# Altium PCB PCB4210B_A00.PcbDoc (part 1 of 2)
Units mm, origin at the board's own origin, x right, y up, seen from the top; angles counter-clockwise.
Board outline 92 x 45 mm, 4 copper layers (Top Layer, Signal Layer 2, Signal Layer 3, Bottom Layer), stack 1.6 mm thick; 99 components, 93 nets, 352 pads, 891 vias.
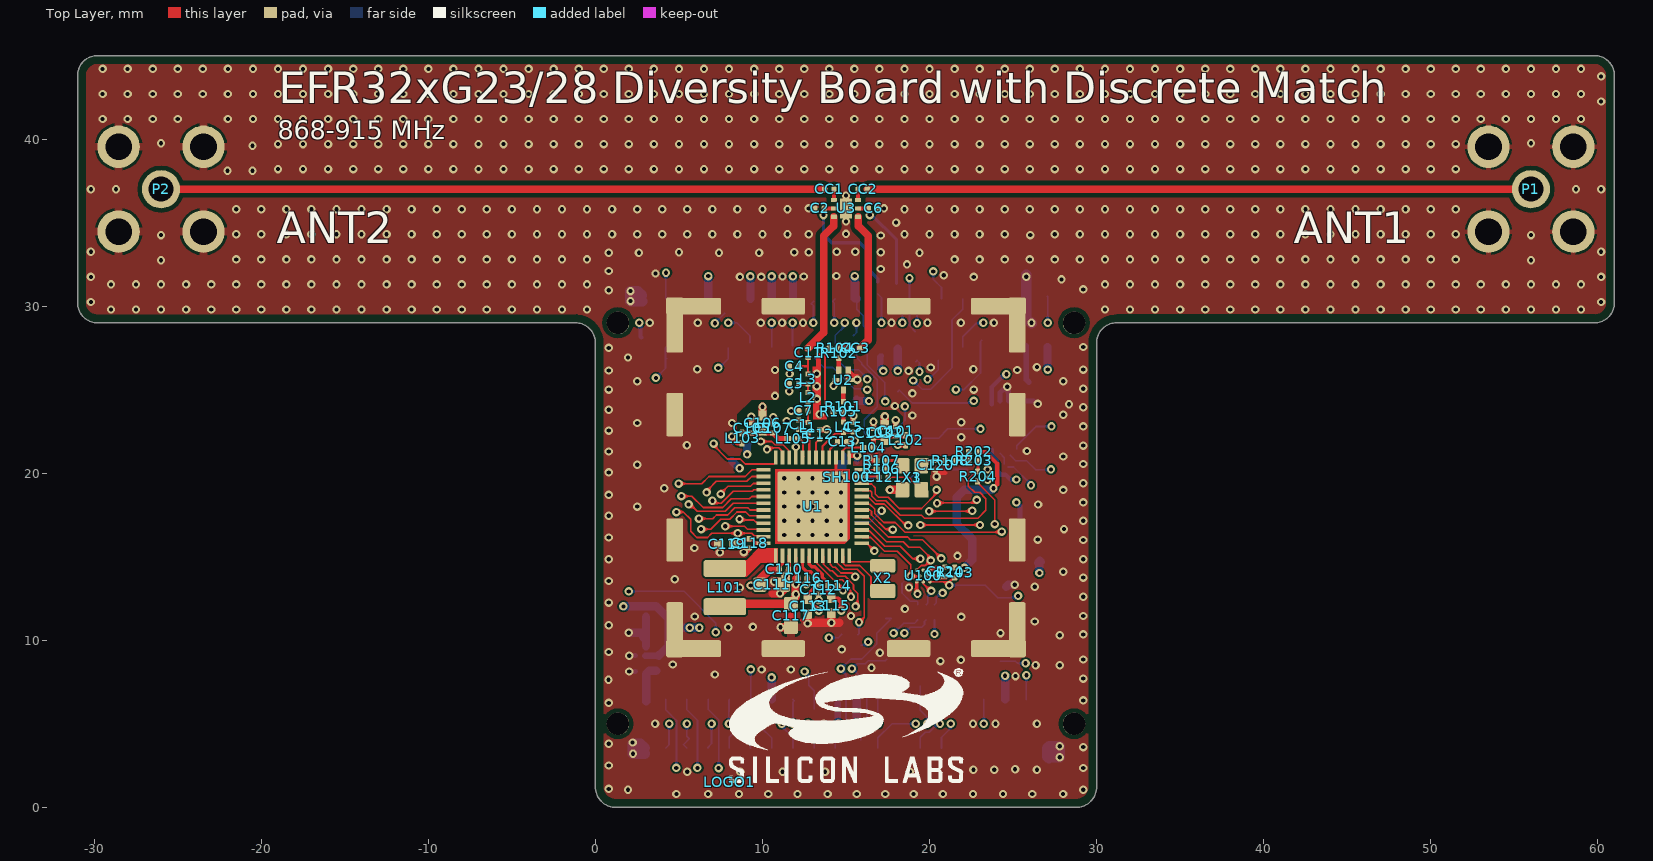
[diagram p0: Top Layer view]
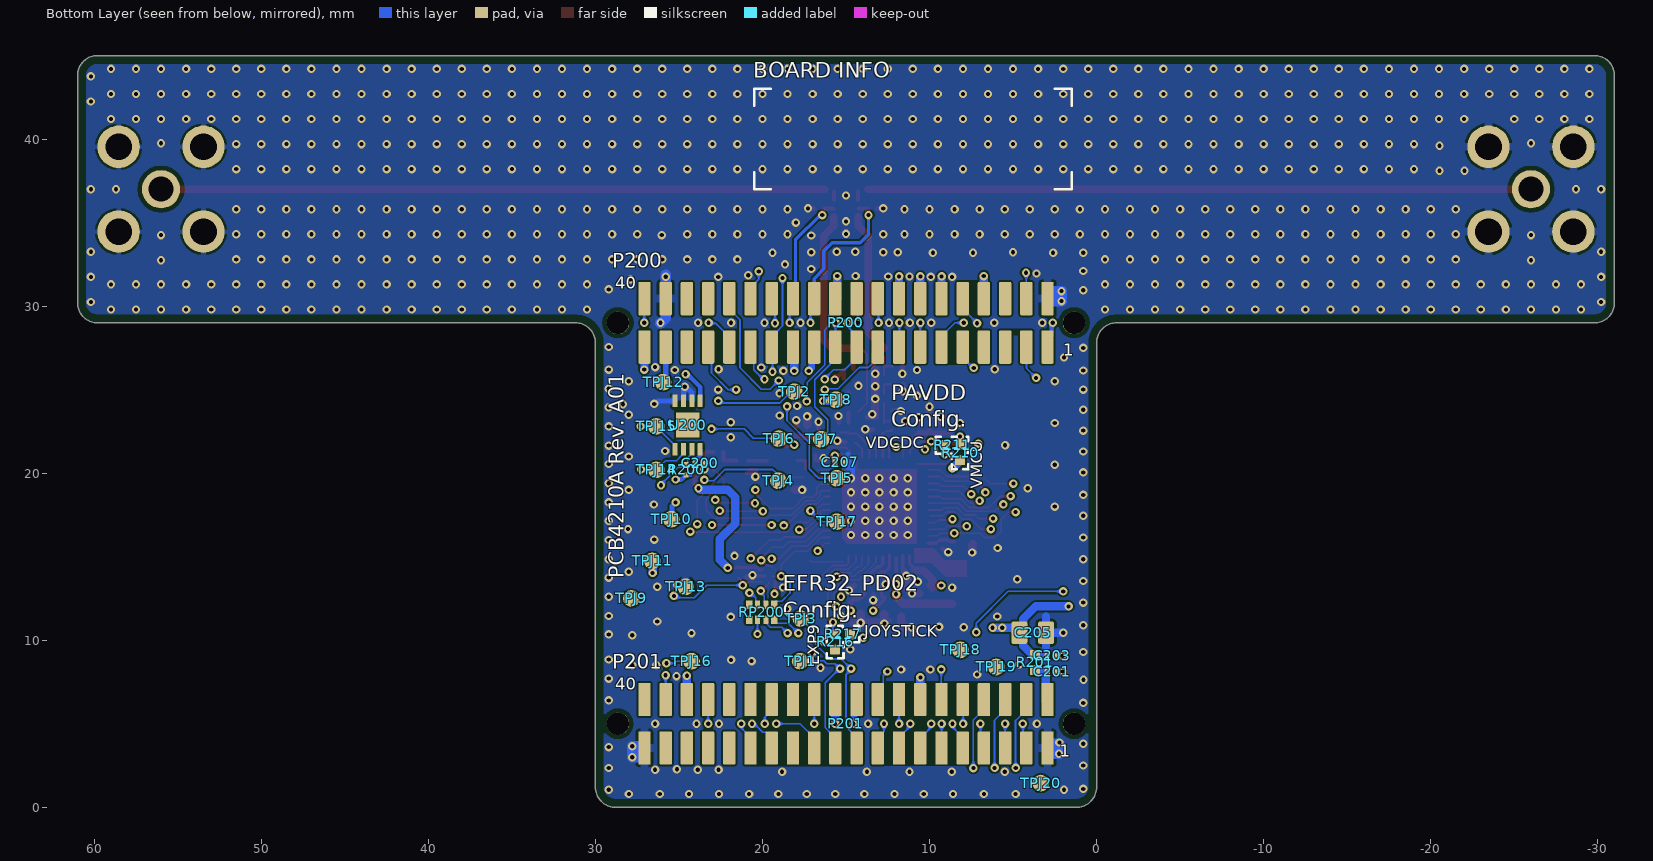
[diagram p1: Bottom Layer view, seen from below]
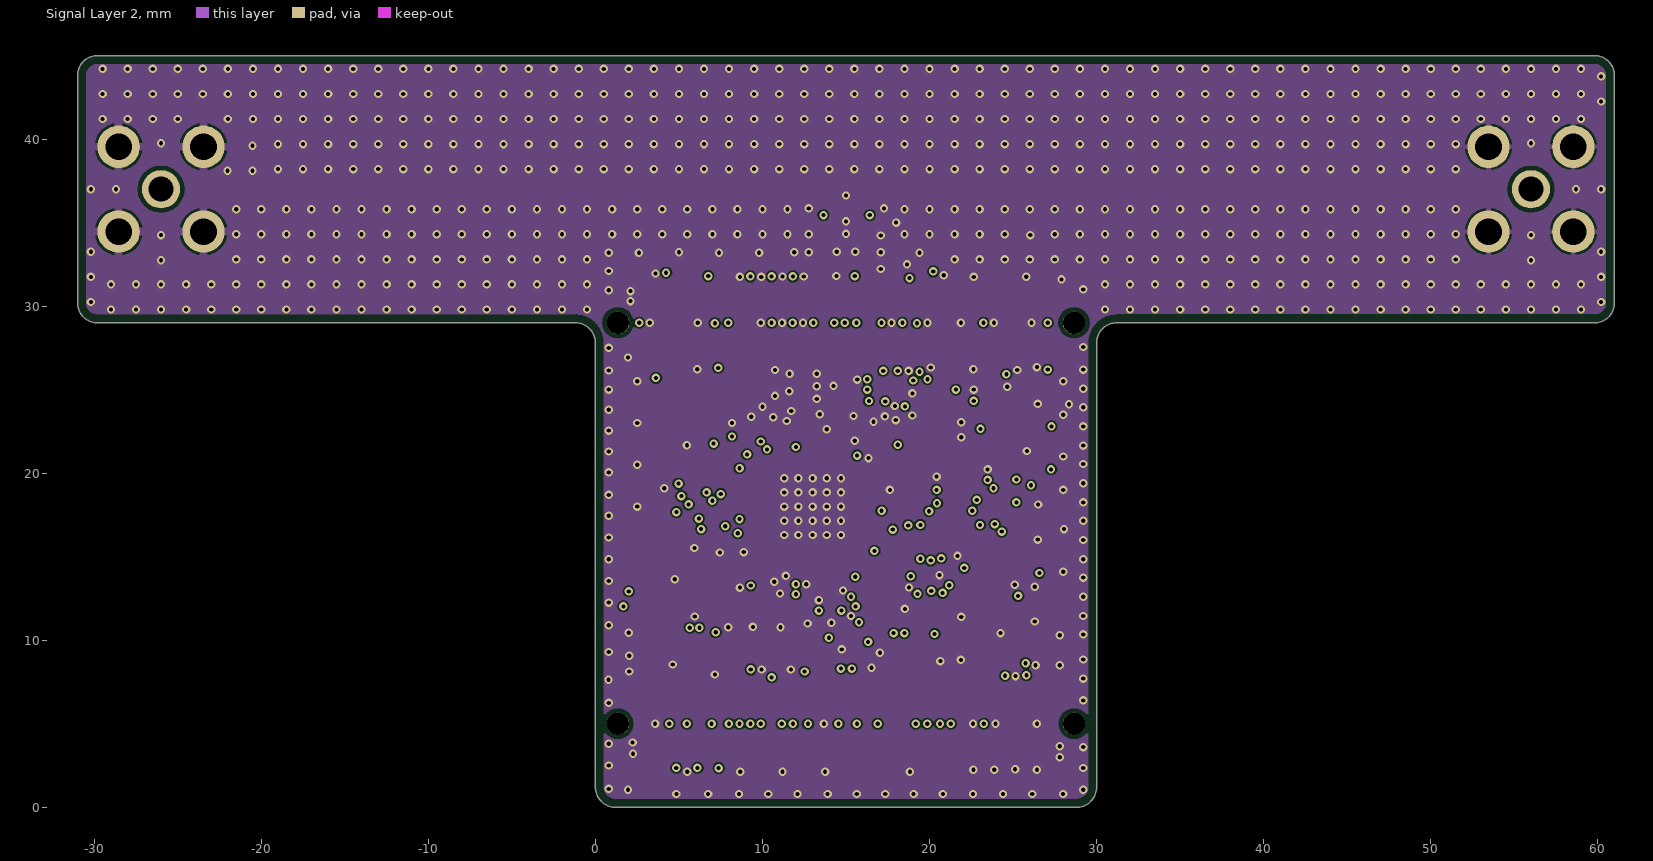
[diagram p2: Signal Layer 2]
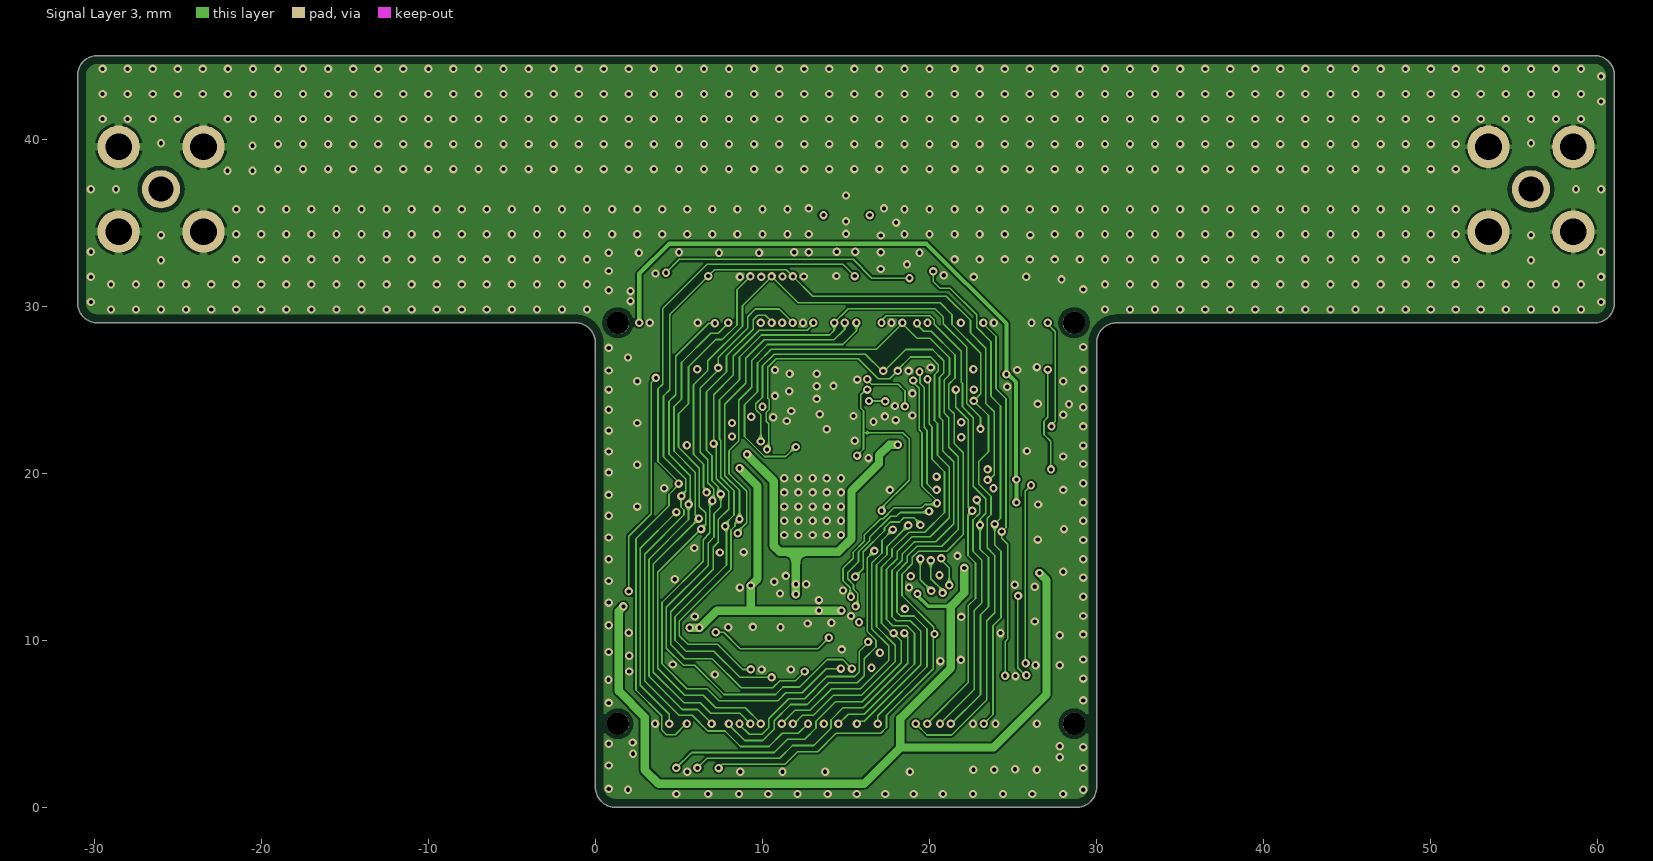
[diagram p3: Signal Layer 3]

## Layer stack, top to bottom
Top Solder: solder mask 0.0102, Solder Resist, Dk 3.5
Top Layer: signal copper 0.035
Dielectric 1: core 0.325, FR-4, Dk 4.2
Signal Layer 2: signal copper 0.018
Dielectric 3: prepreg 0.844, Dk 4.2
Signal Layer 3: signal copper 0.018
Dielectric 2: core 0.325, Dk 4.2
Bottom Layer: signal copper 0.035
Bottom Solder: solder mask 0.0102, Solder Resist, Dk 3.5

## Board outline
0,27.8 ccw(c-1.2,27.8) -1.2,29 -29.8,29 cw(c-29.8,30.2) -31,30.2 -31,43.8 cw(c-29.8,43.8) -29.8,45 59.8,45 cw(c59.8,43.8) 61,43.8 61,30.2 cw(c59.8,30.2) 59.8,29 31.2,29 ccw(c31.2,27.8) 30,27.8 30,1.2 cw(c28.8,1.2) 28.8,0 1.2,0 cw(c1.2,1.2) 0,1.2

## Design rules (kind name [scope] priority, off if disabled: settings)
AcuteAngle [All] p1: minimum=7.00000000000000E+0001 checktracksonly=FALSE
BoardOutlineClearance [All] p1: gap=0.5 ignorepadtopadclearanceinfootprint=FALSE
Clearance Clearance_50Ohm [InNetClass('50Ohm') vs InNet('GND')] p1: gap=0.254 ignorepadtopadclearanceinfootprint=FALSE except(0.15: Track-SMDPad; 0.2: SMDPad-SMDPad)
Clearance Clearance_to_Holes [InPadClass('NPTH')] p2: gap=0.254 ignorepadtopadclearanceinfootprint=FALSE
Clearance Clerance_Polygon [InPolygon] p3: gap=0.1 ignorepadtopadclearanceinfootprint=FALSE
Clearance Clearance_General [All] p4: gap=0.1 ignorepadtopadclearanceinfootprint=FALSE
HoleToHoleClearance HoleToHoleClearance_ANT1toPAD [Incomponent ('ANT1') vs ISpad] p1: gap=0 allowstackedmicrovias=TRUE
HoleToHoleClearance HoleToHoleClearance_R1toR2_1 [Incomponent ('R1') vs Incomponent ('R2')] p2: gap=0 allowstackedmicrovias=TRUE
HoleToHoleClearance HoleToHoleClearance_U1toVIA_1 [InComponent ('U1') vs IsVia] p3: gap=0 allowstackedmicrovias=TRUE
HoleToHoleClearance [All] p4: gap=0.254 allowstackedmicrovias=TRUE
MinimumAnnularRing [All] p1: minimumring=0.125
MinimumSolderMaskSliver [All] p1: minsoldermaskwidth=0.075
PolygonConnect Polygon_VIA_Connect [IsVia] p1: connectstyle=Direct reliefconductorwidth=0.254 reliefentries=4 polygonreliefangle="90 Angle" airgapwidth=0.254
PolygonConnect PolygonConnect_SH100 [InComponent('SH100')] p2: connectstyle=Direct reliefconductorwidth=0.254 reliefentries=4 polygonreliefangle="90 Angle" airgapwidth=0.127
PolygonConnect PolygonConnect_P1 [InComponent('P1')] p3: connectstyle=Relief reliefconductorwidth=0.3 reliefentries=4 polygonreliefangle="90 Angle" airgapwidth=0.127
PolygonConnect [All] p4: connectstyle=Relief reliefconductorwidth=0.5 reliefentries=4 polygonreliefangle="90 Angle" airgapwidth=0.15
RoutingVias [All] p1: holewidth=0.3 width=0.65 viastyle="Through Hole" minholewidth=0.25 minwidth=0.5 maxholewidth=1 maxwidth=1.5
ShortCircuit ShortCircuit_ANTtoPAD [InNet('NetAT1_1') vs InNet('GND')] p1: allowed=TRUE
ShortCircuit ShortCircuit_R1toR2_1 [Incomponent ('R1') vs Incomponent ('R2')] p2: allowed=TRUE
ShortCircuit [All] p3: allowed=FALSE
SilkToSilkClearance [All] p1: silktosilkclearance=0.102
SilkToSolderMaskClearance [IsPad] p1: minsilkscreentomaskgap=0.102 clearancetoexposedcopper=TRUE
SolderMaskExpansion [All] p1: expansion=0.051 istentingtop=FALSE
SupplyNets "Schematic Supply Nets_9" [InNet('VMCU')] p1: voltage=0.000
SupplyNets "Schematic Supply Nets_8" [InNet('USB_VBUS')] p2: voltage=0.000
SupplyNets "Schematic Supply Nets_7" [InNet('VMCU_IN')] p3: voltage=0.000
SupplyNets "Schematic Supply Nets_6" [InNet('PAVDD')] p4: voltage=0.000
SupplyNets "Schematic Supply Nets_5" [InNet('VDCDC')] p5: voltage=0.000
SupplyNets "Schematic Supply Nets_4" [InNet('3V3')] p6: voltage=0.000
SupplyNets "Schematic Supply Nets_3" [InNet('GND')] p7: voltage=0.000
SupplyNets "Schematic Supply Nets_2" [InNet('VRF')] p8: voltage=0.000
SupplyNets "Schematic Supply Nets_1" [InNet('USB_VREG')] p9: voltage=0.000
SupplyNets "Schematic Supply Nets" [InNet('5V')] p10: voltage=0.000
Width 50ohm [InNet('50R*')] p1: maxlimit=0.457 minlimit=0.124 preferedwidth=0.457
Width [All] p2: maxlimit=5.08 minlimit=0.1 preferedwidth=0.125
25 further rules are at their usual default settings.

## Classes and differential pairs
net class 50Ohm: 50R_ANT_A 50R_ANT_B NetC11_2 NetCC1_1 NetCC2_1 NetCC3_1 NetCC3_2
net class WSTK_P[45..0]: DBG_SWCLK DBG_SWDIOTMS "DBG_SWO / DBG_TDO" DBG_TDI DEBUG_TRACED1 DEBUG_TRACED2 DEBUG_TRACED3 DISP_ENABLE DISP_EXTCOMIN DISP_SCLK DISP_SCS DISP_SI EFR32_PA0 EFR32_PA8 EFR32_PA9 EFR32_PA10 EFR32_PB0 EFR32_PB1 EFR32_PB2 EFR32_PB3 EFR32_PC0 EFR32_PC4 EFR32_PC5 EFR32_PC7 EFR32_PD3 EFR32_PD4 EFR32_PD5 EXP_HEADER6 EXP_HEADER9 JOYSTICK WSTK_P22 WSTK_P23 WSTK_P27 WSTK_P28 WSTK_P29 WSTK_P30 WSTK_P32 WSTK_P34 WSTK_P38 WSTK_P39 WSTK_P40
net class WSTK_F[21..0]: DBG_RESET DBG_SWCLK DBG_SWDIOTMS "DBG_SWO / DBG_TDO" DBG_TDI DISP_ENABLE DISP_EXTCOMIN DISP_SCLK DISP_SCS DISP_SI EFR32_PA0 EFR32_PA8 EFR32_PA9 EFR32_PA10 EFR32_PB0 EFR32_PB1 EFR32_PB2 EFR32_PB3 EFR32_PD3 EFR32_PD4 EFR32_PD5 WSTK_F21
net class EFR32_PD[5..0]: EFR32_PD0 EFR32_PD1 EFR32_PD2 EFR32_PD3 EFR32_PD4 EFR32_PD5
net class EFR32_PC[9..0]: DISP_ENABLE DISP_EXTCOMIN EFR32_PC0 EFR32_PC1 EFR32_PC2 EFR32_PC3 EFR32_PC4 EFR32_PC5 EFR32_PC7 EFR32_PC8
net class EFR32_PB[3..0]: EFR32_PB0 EFR32_PB1 EFR32_PB2 EFR32_PB3
net class EFR32_PA[10..0]: DBG_SWCLK DBG_SWDIOTMS "DBG_SWO / DBG_TDO" DBG_TDI DEBUG_TRACED1 DEBUG_TRACED2 DEBUG_TRACED3 EFR32_PA0 EFR32_PA8 EFR32_PA9 EFR32_PA10
component class "04_ WSTK Connectors & Board ID": C200 C201 C203 C205 P200 P201 R200 R201 TPJ1 TPJ2 TPJ3 TPJ4 TPJ5 TPJ6 TPJ7 TPJ8 TPJ9 TPJ10 TPJ11 TPJ12 TPJ13 TPJ14 TPJ15 TPJ16 TPJ17 TPJ18 TPJ19 TPJ20 U200
component class "03_ EFR32 Signal Assignments": C124 C207 R103 R202 R203 R204 R216 R217 RP200 U1 U100 X2
component class "02_ RF & Power": C1 C2 C3 C4 C5 C6 C7 C11 C12 C13 C101 C102 C103 C105 C106 C107 C110 C111 C112 C113 C114 C115 C116 C117 C118 C119 C120 C121 CC1 CC2 CC3 L1 L2 L3 L4 L101 L102 L103 L104 L105 P1 P2 R101 R102 R104 R105 R106 R107 R108 R210 R211 SH100 U2 U3 X1 X3
pad class NPTH: P200-M1 P200-M2 P201-M1 P201-M2

## Components (designator, comment, footprint, x,y, rotation, side; value= is the part's Value field where it differs from the comment)
C1 "1P9" C0201_L 12.175,22.9 r90 top
C2 "10P" C0201_L 13.425,35.85 r0 top
C3 "7P2" C0201_L 11.875,25.35 r180 top
C4 "1P3" C0201_L 11.9,26.4 r180 top
C5 "TBD" C0201_L 15.425,22.75 r90 top
C6 "10P" C0201_L 16.625,35.85 r180 top
C7 "NM" C0201_L 12.45,23.725 r180 top
C11 "220P" C0201_L 12.73,27.2 r90 top
C12 "1P5" C0201_L 13.425,22.325 r90 top
C13 "1P5" C0201_L 14.775,21.875 r0 top
C101 "TBD" C0201_L 17.975,22.5 r90 top
C102 "1U" C0402_L 17.325,22.425 r90 top
C103 "100P" C0201_L 16.65,22.4 r90 top
C105 "TBD" C0201_L 9.35,22.675 r90 top
C106 "470N" C0402_L 10,23 r90 top
C107 "100P" C0201_L 10.625,22.675 r90 top
C110 "100N" C0201_L 11.275,14.25 r0 top
C111 "10U" C0603_L 10.55,13.325 r0 top
C112 "10N" C0201_L 13.35,13.025 r270 top
C113 "1U" C0402_L 12.7,12.025 r270 top
C114 "100N" C0201_L 14.2,13.275 r0 top
C115 "1U" C0402_L 14.125,12.075 r270 top
C116 "100N" C0201_L 12.4,13.725 r0 top
C117 "4U7" C0603_L 11.7,11.475 r270 top
C118 "100N" C0201_L 9.2,15.8 r270 top
C119 "1U" C0402_L 7.85,15.75 r180 top
C120 "100N" C0201_L 20.35,20.475 r270 top
C121 "100P" C0201_L 17.25,19.75 r180 top
C124 "100N" C0201_L 20.925,14.1 r270 top
C200 "100N" C0201_L 23.75,20.6 r180 bottom
C201 "100N" C0201_L 2.675,8.125 r180 bottom
C203 "100N" C0201_L 2.675,9.075 r180 bottom
C205 "10U" C0805_L 3.825,10.45 r180 bottom
C207 "100N" C0201_L 15.375,20.65 r180 bottom
CC1 "47P" C0201_L 14,37 r180 top
CC2 "47P" C0201_L 16,37 r0 top
CC3 "47P" C0201_L 15.55,27.475 r0 top
Designator39 "Comment" PCB_SPEC_4_LAYER -68.7,108.2 r0 top
L1 "1N5" COIL_0201_L 12.725,22.725 r90 top
L2 "1N3" COIL_0201_L 12.725,24.525 r90 top
L3 "13N" COIL_0201_L 12.725,25.625 r90 top
L4 "18N" COIL_0201_L 14.85,22.75 r90 top
L101 "2U2" COIL_1008_L 7.75,13.15 r270 top
L102 "BLM03AG700SN1D" COIL_MUR_BLM03_0201 18.575,21.975 r90 top
L103 "0R" COIL_MUR_BLM03_0201 8.775,22.1 r90 top
L104 "0R" COIL_MUR_BLM03_0201 16.325,21.525 r180 top
L105 "BLM03PG330SN1D" COIL_MUR_BLM03_0201 11.825,22.075 r0 top
LOGO1 "Comment" LOGO_SILABS_W14.0 8,1.5 r0 top
P1 "SMA" TE_SMA_1814832_TH_VER 56,37 r0 top
P2 "SMA" TE_SMA_1814832_TH_VER -26,37 r0 top
P200 "SOCKET_WCON_2X20_1.27MM_SMD" SAM_SFC-120-T2-D-A-2X20_SNUM 15,29 r0 bottom locked
P201 "SOCKET_WCON_2X20_1.27MM_SMD" SAM_SFC-120-T2-D-A-2X20_SNUM 15,5 r0 bottom locked
R101 "0R" R0201_L 14.85,23.975 r90 top
R102 "0R" R0201_L 14.575,27.175 r90 top
R103 "330K" R0201_L 21.5,14.05 r90 top
R104 "NM" R0201_L 14.315,27.475 r180 top
R105 "NM" R0201_L 14.55,23.675 r180 top
R106 "NM" R0201_L 17.125,20.25 r180 top
R107 "0R" R0201_L 17.125,20.75 r180 top
R108 "0R" R0201_L 21.25,20.75 r180 top
R200 "10K" R0201_L 24.575,20.2 r270 bottom
R201 "0R" R0402_L 3.7,8.675 r90 bottom
R202 "0R" R0201_L 22.65,21.275 r0 top
R203 "NM" R0201_L 22.65,20.75 r0 top
R204 "0R" R0201_L 22.875,19.8 r90 top
R210 "0R" R0402_L 8.175,21.225 r270 bottom
R211 "0R" R0402_L 8.625,21.675 r180 bottom value=NM
R216 "0R" R0402_L 15.65,9.9 r270 bottom
R217 "0R" R0402_L 15.2,10.35 r180 bottom
RP200 "100R" RES_MNR04-8 20.05,11.675 r0 bottom
SH100 "RF_SHIELD_FRAME_36103205S" shield_21x21mm 15,19.75 r180 top locked
TPJ1 "TPJ_SMD" TP_1.0_SMD 17.75,8.75 r90 bottom locked
TPJ2 "TPJ_SMD" TP_1.0_SMD 18.1,24.88 r90 bottom locked
TPJ3 "TPJ_SMD" TP_1.0_SMD 17.7,11.3 r90 bottom locked
TPJ4 "TPJ_SMD" TP_1.0_SMD 19.05,19.55 r90 bottom locked
TPJ5 "TPJ_SMD" TP_1.0_SMD 15.55,19.7 r90 bottom locked
TPJ6 "TPJ_SMD" TP_1.0_SMD 19.02,22.07 r90 bottom locked
TPJ7 "TPJ_SMD" TP_1.0_SMD 16.49,22.03 r90 bottom locked
TPJ8 "TPJ_SMD" TP_1.0_SMD 15.6,24.4 r90 bottom locked
TPJ9 "TPJ_SMD" TP_1.0_SMD 27.85,12.5 r90 bottom locked
TPJ10 "TPJ_SMD" TP_1.0_SMD 25.45,17.25 r90 bottom locked
TPJ11 "TPJ_SMD" TP_1.0_SMD 26.6,14.75 r90 bottom locked
TPJ12 "TPJ_SMD" TP_1.0_SMD 25.95,25.45 r90 bottom locked
TPJ13 "TPJ_SMD" TP_1.0_SMD 24.6,13.2 r90 bottom locked
TPJ14 "TPJ_SMD" TP_1.0_SMD 26.35,20.2 r90 bottom locked
TPJ15 "TPJ_SMD" TP_1.0_SMD 26.35,22.8 r90 bottom locked
TPJ16 "TPJ_SMD" TP_1.0_SMD 24.25,8.75 r90 bottom locked
TPJ17 "TPJ_SMD" TP_1.0_SMD 15.55,17.1 r90 bottom locked
TPJ18 "TPJ_SMD" TP_1.0_SMD 8.15,9.42 r90 bottom locked
TPJ19 "TPJ_SMD" TP_1.0_SMD 6,8.4 r90 bottom locked
TPJ20 "TPJ_SMD" TP_1.0_SMD 3.34,1.45 r90 bottom locked
U1 "EFR32FG23B020F512IM48" QFN48_M040_6.0X6.0_EP_SL 13,18 r180 top
U2 "SF4000-914-06-SX (US)" SF1256 14.85,25.575 r90 top
U3 "SKY13438-374LF" SKY13438-374LF 15,35.85 r0 top
U100 "MX25R8035F" BGA8_M040_1.24X1.75_WLCSP 19.625,13.85 r270 top
U200 "M24C02" TDFN8_M050_2.0X3.0_EP 24.475,22.875 r270 bottom
X1 "NM" KDS_DSX211SH_2016 18.95,19.725 r270 top value="39.000 MHz"
X2 "32.768 kHz" X_MCS_CM8V-T1A 17.2,13.7 r270 top
X3 "39.0MHz" TCXO_7Z-38.400MBG-T_SMD2016_TXC 18.95,19.725 r270 top

## Footprints (in the part's own frame and the unit in brackets; to place one, negate y for a bottom-side part, rotate by r counter-clockwise, add the part's x,y. Pads: shape width x height; smd on the part's side, far side on the other; paste and mask are expansions set on the pad)
BGA8_M040_1.24X1.75_WLCSP [mm] "BGA, 8 pin. U100"
  round 0.21 smd mask+0.038: A1(-0.35,0.4) A3(0.35,0.4) B2(0,0.2) C1(-0.35,0) C3(0.35,0) D2(0,-0.2) E1(-0.35,-0.4) E3(0.35,-0.4)
  body extent -0.63,-0.89 0.63,0.88, height 0.52
C0201_L [mm] "Capacitor, Chip; 0.60 mm L X 0.30 mm W X 0.33 mm H body"
  rrect52% 0.31x0.34 smd: 1(-0.275,0) 2(0.275,0)
  body extent -0.3,-0.15 0.3,0.15, height 0.3
C0402_L [mm] "Chip Capacitor, 2-Leads, Body 1.0x0.5mm, IPC High Density"
  rrect20% 0.6x0.5 smd mask+0.051: 1(-0.45,0) 2(0.45,0)
  body extent -0.5,-0.25 0.5,0.25, height 0.6
C0603_L [mm] "Capacitor, 0603, High Density (C)"
  rrect25% 0.8x0.85 smd: 1(-0.7,0) 2(0.7,0)
  body extent -0.8,-0.4 0.8,0.4, height 0.95
C0805_L [mm] "Capacitor, 0805"
  rrect25% 0.95x1.35 smd: 1(-0.8,0) 2(0.8,0)
  body extent -1.1,-0.72 1.1,0.72, height 1.45
COIL_0201_L [mm] "JELF243C-0021"
  rrect10% 0.3x0.3 smd: 1(-0.3,0) 2(0.3,0)
  body extent -0.32,-0.17 0.32,0.17, height 0.33
COIL_1008_L [mil] "Chip Inductors, 1008 (2520), Coilcraft (190207)"
  rrect25% 40x100 smd: 1(-45,0) 2(45,0)
  body extent -58,-55 57,55, height 80
COIL_MUR_BLM03_0201 [mm] "COIL_MUR_BLM03_0201"
  rrect25% 0.4x0.3 smd mask+0.051: 1(-0.3,0) 2(0.3,0)
  body extent -0.3,-0.15 0.3,0.15, height 0.95
KDS_DSX211SH_2016 [mm] "Copy of Silabs CE  X_KDS_DSX211SH_2.0X1.65-4"
  rrect20% 0.9x0.8 smd mask+0.051: 1(-0.7,-0.55) 2(0.7,-0.55) 3(0.7,0.55) 4(-0.7,0.55)
  body extent -1.07,-0.87 1.08,0.88, height 0.5
LOGO_SILABS_W14.0 [mm] "LOGO_SILABS_W14.0"
  silkscreen extent 0.03,0 13.99,6.83
PCB_SPEC_4_LAYER [mm]
QFN48_M040_6.0X6.0_EP_SL [mm]
  rrect5% 4.2x4.2 smd paste-4.2 mask-4.2: 0(0,0)
  rect 0.86x0.22 smd paste+0 mask+0.06: 1(-2.935,2.2) 2(-2.935,1.8) 3(-2.935,1.4) 4(-2.935,1) 5(-2.935,0.6) 6(-2.935,0.2) 7(-2.935,-0.2) 8(-2.935,-0.6) 9(-2.935,-1) 10(-2.935,-1.4) 11(-2.935,-1.8) 12(-2.935,-2.2) 25(2.935,-2.2) 26(2.935,-1.8) 27(2.935,-1.4) 28(2.935,-1) 29(2.935,-0.6) 30(2.935,-0.2) 31(2.935,0.2) 32(2.935,0.6) 33(2.935,1) 34(2.935,1.4) 35(2.935,1.8) 36(2.935,2.2)
  rect 0.22x0.86 smd paste+0 mask+0.06: 13(-2.2,-2.935) 14(-1.8,-2.935) 15(-1.4,-2.935) 16(-1,-2.935) 17(-0.6,-2.935) 18(-0.2,-2.935) 19(0.2,-2.935) 20(0.6,-2.935) 21(1,-2.935) 22(1.4,-2.935) 23(1.8,-2.935) 24(2.2,-2.935) 37(2.2,2.935) 38(1.8,2.935) 39(1.4,2.935) 40(1,2.935) 41(0.6,2.935) 42(0.2,2.935) 43(-0.2,2.935) 44(-0.6,2.935) 45(-1,2.935) 46(-1.4,2.935) 47(-1.8,2.935) 48(-2.2,2.935)
  Top Layer region: 2.225,-2.225 -2.225,-2.225 -2.225,1.925 -1.925,2.225 2.225,2.225
  Top Layer pour cut-out: -2.505,-2.31 -2.31,-2.505 2.31,-2.505 2.505,-2.31 2.505,2.309 2.309,2.505 -2.31,2.505 -2.505,2.309
  body extent -3,-3 3,3, height 0.86
R0201_L [mm] "Resistor (Chip2PinSM127P600-8N) (170921)"
  rrect25% 0.34x0.32 smd: 1(-0.3,0) 2(0.3,0)
  body extent -0.32,-0.13 0.32,0.13, height 0.3
R0402_L [mm] "Chip Resistor, 2-Leads, Body 1.0x0.5mm, IPC High Density"
  rrect20% 0.6x0.6 smd mask+0.051: 1(-0.45,0) 2(0.45,0)
  body extent -0.5,-0.25 0.5,0.25, height 0.6
RES_MNR04-8 [mm] "Chip resistor network 8pin"
  rrect20% 0.4x0.5 smd mask+0.051: 1(-0.75,-0.45) 4(0.75,-0.45) 5(0.75,0.45) 8(-0.75,0.45)
  rrect20% 0.3x0.5 smd mask+0.051: 2(-0.25,-0.45) 3(0.25,-0.45) 6(0.25,0.45) 7(-0.25,0.45)
  body extent -1,-0.4 1,0.4, height 0.5
SAM_SFC-120-T2-D-A-2X20_SNUM [mm]
  rrect20% 0.74x2 smd mask+0.05: 1(-12.065,1.45) 2(-12.065,-1.45) 3(-10.795,1.45) 4(-10.795,-1.45) 5(-9.525,1.45) 6(-9.525,-1.45) 7(-8.255,1.45) 8(-8.255,-1.45) 9(-6.985,1.45) 10(-6.985,-1.45) 11(-5.715,1.45) 12(-5.715,-1.45) 13(-4.445,1.45) 14(-4.445,-1.45) 15(-3.175,1.45) 16(-3.175,-1.45) 17(-1.905,1.45) 18(-1.905,-1.45) 19(-0.635,1.45) 20(-0.635,-1.45) 21(0.635,1.45) 22(0.635,-1.45) 23(1.905,1.45) 24(1.905,-1.45) 25(3.175,1.45) 26(3.175,-1.45) 27(4.445,1.45) 28(4.445,-1.45) 29(5.715,1.45) 30(5.715,-1.45) 31(6.985,1.45) 32(6.985,-1.45) 33(8.255,1.45) 34(8.255,-1.45) 35(9.525,1.45) 36(9.525,-1.45) 37(10.795,1.45) 38(10.795,-1.45) 39(12.065,1.45) 40(12.065,-1.45)
  round 1.35 hole 1.35 unplated paste-2539.97 mask-5.563: M1(13.652,0) M2(-13.652,0)
  body extent -14.29,-2.1 14.29,2.16, height 4.67
SF1256 [mm] "nihon dempa kogyo  SF1256-923-02a"
  rect 0.425x0.325 smd: 1(-0.588,0) 3(0.588,-0.288) 4(0.588,0.288)
  rect 0.25x0.525 smd: 2(0,-0.388) 5(0,0.388)
  body extent -0.67,-0.53 0.67,0.53, height 0.54
shield_21x21mm [mm]
  rrect20% 1x3.3 smd paste+0 mask+0.05: 1(-10.25,9.125) 1(-10.25,-9.125) 1(10.25,9.125) 1(10.25,-9.125)
  rrect20% 1x2.6 smd paste+0 mask+0.05: 1(-10.25,-3.75) 1(-10.25,3.75) 1(10.25,-3.75) 1(10.25,3.75)
  rrect20% 3.3x1 smd paste+0 mask+0.05: 1(-9.125,10.25) 1(-9.125,-10.25) 1(9.125,10.25) 1(9.125,-10.25)
  rrect20% 2.6x1 smd paste+0 mask+0.05: 1(-3.75,10.25) 1(-3.75,-10.25) 1(3.75,10.25) 1(3.75,-10.25)
  body extent -13,-13 12.99,12.99, height 5.08
SKY13438-374LF [mm]
  rect 0.35x0.25 smd: 1(-0.725,0.5) 2(-0.725,0) 3(-0.725,-0.5) 4(0.725,-0.5) 5(0.725,0) 6(0.725,0.5)
  rect 0.7x1.2 smd: 7(0,0)
  body extent -0.67,-0.53 0.67,0.53, height 0.54
TCXO_7Z-38.400MBG-T_SMD2016_TXC [mm] "TCXO_7Z-38.400MBG-T_SMD2016_TXC"
  rrect20% 0.44x0.8 smd mask+0.051: 1(-0.975,-0.6) 2(0.975,-0.6) 3(0.975,0.6) 4(-0.975,0.6)
  body extent -1.07,-0.87 1.07,0.87, height 0.81
TDFN8_M050_2.0X3.0_EP [mm] "TDFN8_M050_2.0x3.0_EP"
  rrect20% 0.75x0.3 smd mask+0.051: 1(-1.45,0.75) 2(-1.45,0.25) 3(-1.45,-0.25) 4(-1.45,-0.75) 5(1.45,-0.75) 6(1.45,-0.25) 7(1.45,0.25) 8(1.45,0.75)
  rect 1.5x1.4 smd mask+0.051: 9(0,0)
  body extent -1.5,-1 1.5,1, height 1.01
TE_SMA_1814832_TH_VER [mm]
  round 2.286 hole 1.5: 1(0,0)
  round 2.54 hole 1.6: 2(-2.54,-2.54) 3(2.54,-2.54) 4(2.54,2.54) 5(-2.54,2.54)
  body extent -3.2,-3.2 3.2,3.2, height 9.5
TP_1.0_SMD [mm] "Test Point, 1.0 mm, SMD"
  round 1 smd paste-0.501: 1(0,0)
  body extent -0.2,-0.2 0.2,0.2, height 0.01
X_MCS_CM8V-T1A [mm] "Crystal MCS CM8V-T1A (2 pin)"
  rrect25% 0.8x1.5 smd mask+0.051: 1(-0.75,0)
  rrect25% 0.85x1.5 smd mask+0.051: 2(0.75,0)
  body extent -1,-0.6 1,0.6, height 0.95

## Part data
C1 C3 C4 C7: library part C0201, Tolerance=±0.1pF, Mfg=Murata, PCB Footprint=C0201_L, Technology=C0G
  C1 C7: Mfg #=GRM0335C1H1R9BA01D, Part Reference=C1
  C3: Mfg #=GRM0335C1H7R2BA01D, Part Reference=C3
  C4: Mfg #=GRM0335C1H1R3BA01D, Part Reference=C4
C2 C6 C11 CC1 CC2 CC3: library part C0201, Tolerance=±2%, Mfg=Murata, PCB Footprint=C0201_L, Technology=C0G
  C2 C6 CC1 CC2 CC3: Mfg #=GJM0335C1E180GB01D, Part Reference=CC11
  C11: Mfg #=GRM0335C1H221GA01D, Part Reference=C11
C5 C12 C13 C120 C121: library part C0201, Tolerance=±0.05pF, PCB Footprint=C0201_L
  C5: Not Mounted=NM, Part Reference=C5
  C12: Mfg=Murata, Mfg #=GRM0335C1E1R5WA01D, Not Mounted=NM, Part Reference=C12, Technology=C0G
  C13: Mfg=Murata, Mfg #=GRM0335C1E1R5WA01D, Not Mounted=NM, Part Reference=C13, Technology=C0G
  C120 C121: Mfg=Murata, Mfg #=GRM0335C1E1R5WA01D, Part Reference=C13, Technology=C0G
C101 C105: library part C0201, Rating=50V, Tolerance=±0.05P, Not Mounted=NM, PCB Footprint=C0201_L, Technology=C0G
  C101: Part Reference=C101
  C105: Part Reference=C105
C102 C113 C115 C119: library part C0402, Rating=6.3V, Tolerance=10%, PCB Footprint=C0402_L, Technology=X7R
  C102: Part Reference=C102
  C113: Part Reference=C113
  C115: Part Reference=C115
  C119: Part Reference=C119
C103 C107: library part C0201, Rating=25V, Tolerance=5%, PCB Footprint=C0201_L, Technology=C0G
  C103: Part Reference=C103
  C107: Part Reference=C107
C106: library part C0402, Rating=10V, Tolerance=10%, Part Reference=C106, PCB Footprint=C0402_L, Technology=X7R
C110 C114 C116 C118 C124 C200 C201 C203 C207: library part C0201, Rating=16V, Tolerance=20%, PCB Footprint=C0201_L, Technology=X7S
  C110: Part Reference=C110
  C114: Part Reference=C114
  C116: Part Reference=C116
  C118: Part Reference=C118
  C124: Part Reference=C124
  C200: Part Reference=C200
  C201: Part Reference=C201
  C203: Part Reference=C203
  C207: Part Reference=C207
C111: library part C0603, Rating=25V, Tolerance=10%, Part Reference=C111, PCB Footprint=C0603_L, Technology=X5R
C112: library part C0201, Rating=16V, Tolerance=10%, Part Reference=C112, PCB Footprint=C0201_L, Technology=X7S
C117: library part C0603, Rating=6.3V, Tolerance=10%, Part Reference=C117, PCB Footprint=C0603_L, Technology=X7R
C205: library part CAPACITOR, Not Mounted=NM, Part Reference=C205, PCB Footprint=C0805_L, Technology=X5R
L1 L2: library part L0201, Tolerance=±0.05nH, Mfg=Murata, PCB Footprint=COIL_0201_L
  L1: Mfg #=LQP03HQ1N5W02D, Part Reference=L1
  L2: Mfg #=LQP03HQ1N3W02D, Part Reference=L2
L3 L4: library part L0201, Tolerance=±3%, Mfg=Murata, PCB Footprint=COIL_0201_L
  L3: Mfg #=LQP03HQ13NH02D, Part Reference=L3
  L4: Mfg #=LQP03HQ18NH02D, Part Reference=L4
L101: library part L1008, Tolerance=+/-20%, Mfg=Murata, Mfg #=DFE2HCAH2R2MJ0L, Part Reference=L101, PCB Footprint=COIL_1008_L
L102 L103 L104 L105: library part BLM03AX, PCB Footprint=COIL_MUR_BLM03_0201, Price_1K=0.05
  L102: Mfg=Murata, Mfg #=BLM03AG700SN1D, Part Reference=L102
  L103: Part Reference=L103
  L104: Part Reference=L104
  L105: Mfg=Murata, Mfg #=BLM03PG330SN1D, Part Reference=L105
P1 P2: library part SMA_TH_WELLSHOW, Mfg=Wellshow, Mfg #=C02AN31P00101, Part Reference=P1, PCB Footprint=TE_SMA_1814832_TH_VER, Price_1K=1.46
R101 R102 R103 R104 R105 R106 R107 R108 R200 R202 R203 R204: library part R0201, Price_1K=0.005
  R103: Part Reference=R103, PCB Footprint=R0201_L
  R104 R105: Not Mounted=NM
  R200: Part Reference=R200, PCB Footprint=R0201_L
R201: library part RESISTOR, Part Reference=R201, PCB Footprint=R0402_L, Price_1K=0.005
R210 R211 R216 R217: library part R0402, PCB Footprint=R0402_L, Price_1K=0.005
  R210: Part Reference=R210
  R211: Not Mounted=NM, Part Reference=R211
  R216: Part Reference=R216
  R217: Not Mounted=NM, Part Reference=R217
RP200: library part MNR04M0APJ101, Mfg=ROHM, Mfg #=MNR04M0APJ101, Part Reference=RP200, PCB Footprint=RES_MNR04-8, Price_1K=0.0122
TPJ1 TPJ2 TPJ3 TPJ4 TPJ5 TPJ6 TPJ7 TPJ8 TPJ17: library part TPJ_SMD_Dup1, PCB Footprint=TP_1.0_SMD
  TPJ1: Part Reference=TPJ1
  TPJ2: Part Reference=TPJ2
  TPJ3: Part Reference=TPJ3
  TPJ4: Part Reference=TPJ4
  TPJ5: Part Reference=TPJ5
  TPJ6: Part Reference=TPJ6
  TPJ7: Part Reference=TPJ7
  TPJ8: Part Reference=TPJ8
  TPJ17: Part Reference=TPJ17
U1: library part EFR32xG23_QFN48, Mfg="Silicon Labs", Mfg #=EFR32ZG23B020F512IM48-CR, Part Reference=U1, PCB Footprint=QFN48_M040_6.0X6.0_EP_SL
U2: library part SF4000-914-06-SX, "B2645 from Qualcomm also fits", Mfg=ACTE, Mfg #=SF4000-914-06-SX
U100: library part MX25R8035, Mfg=Macronix, Mfg #=MX25R8035FBDIL0, Part Reference=U100, PCB Footprint=BGA8_M040_1.24x1.75_WLCSP, Price_1K=0.25
X1: library part DSX211SH, Mfg=Tai-Saw, Mfg #=TZ3541C, Part Reference=X1, PCB Footprint=KDS_DSX211SH_2016, Price_1K=0.512
X2: library part CM8V-T1A, Mfg="Micro Crystal AG", Mfg #=CM8V-T1A-32.768KHZ-7PF-20PPM-TA-QC, Part Reference=X2, PCB Footprint=X_MCS_CM8V-T1A, Price_1K=0.3
X3: library part 7Z-38.400MBG-T, Mfg=TXC, Mfg #=7Z-38.400MBG-T, Part Reference=X1
P200: Mfg=WCON, Mfg #=2344-220MS3CUNR6, Part Reference=P200, PCB Footprint=SAM_SFC-120-T2-D-A-2X20_SNUM, Price_1K=3.44
P201: Mfg=WCON, Mfg #=2344-220MS3CUNR6, Part Reference=P201, PCB Footprint=SAM_SFC-120-T2-D-A-2X20_SNUM, Price_1K=3.44
SH100: Mfg="Würth Elektronik", Mfg #=36103205S, Not Mounted=NM, Part Reference=SH100, PCB Footprint=Shield_21x21mm, Price_1K=1.00
TPJ9: Part Reference=TPJ9, PCB Footprint=TP_1.0_SMD
TPJ10: Part Reference=TPJ10, PCB Footprint=TP_1.0_SMD
TPJ11: Part Reference=TPJ11, PCB Footprint=TP_1.0_SMD
TPJ12: Part Reference=TPJ12, PCB Footprint=TP_1.0_SMD
TPJ13: Part Reference=TPJ13, PCB Footprint=TP_1.0_SMD
TPJ14: Part Reference=TPJ14, PCB Footprint=TP_1.0_SMD
TPJ15: Part Reference=TPJ15, PCB Footprint=TP_1.0_SMD
TPJ16: Part Reference=TPJ16, PCB Footprint=TP_1.0_SMD
TPJ18: Part Reference=TPJ18, PCB Footprint=TP_1.0_SMD
TPJ19: Part Reference=TPJ19, PCB Footprint=TP_1.0_SMD
TPJ20: Part Reference=TPJ20, PCB Footprint=TP_1.0_SMD
U3: Mfg=Infineon, Mfg #=BGS12WN6E6327XTSA1
U200: CONTEC Footprint=MSOP8_M065_W3.0, Mfg="ST Microelectronics", Mfg #=M24C02-FMC6TG, Part Reference=U200, PCB Footprint=TDFN8_M050_2.0X3.0_EP, Price_1K=0.06

## Via types
v1: diameter 0.5, hole 0.25, Top Layer to Bottom Layer, tented both sides, 814 vias
v2: diameter 0.508, hole 0.25, Top Layer to Bottom Layer, tented both sides, 77 vias

## Nets (pads, with @x,y where several pads share a name; then routed paths per layer and width w, separated by ;. In a path a pad name is that pad's centre, name@x,y a point inside that pad or via, vN(x,y) a via of type N, cw(c..) or ccw(c..) an arc to the next point about the centre after c; other vN are vias at no path point)
3V3: C200.1 P200.1 R200.2 TPJ10.1 U200.1 U200.8 | length 46
  Signal Layer 3 w0.254: v1(2.625,29) 2.625,31.95 4.404,33.729 19.821,33.729 24.6,28.95 v1(24.6,25.925) 24.7,25.925 25.177,25.448 25.177,19.625 v1(25.2,19.625) v1(25.2,18.25) 25.175,18.25 v1@25.125,18.2
  Bottom Layer w0.254: v1(2.625,29) 2.625,29.05 2.588,29.012 2.7,28.9 2.7,28.175 P200.1@2.75,28.125 ; U200.8@23.725,21.425 23.725,21.05 24.025,20.75 C200.1@24.025,20.625 ; U200.1@23.725,24.125 23.725,25.152 24.498,25.925 v1(24.6,25.925) ; C200.1@24.025,20.6 24.025,20.175 24.3,19.9 R200.2@24.525,19.9 ; R200.2@24.575,19.885 24.835,19.625 v1(25.2,19.625)
  Bottom Layer w0.305: v1(25.2,18.25) 25.425,18.025 TPJ10.1@25.425,17.1
5V: P200.37 TPJ12.1 | length 2.2
  Bottom Layer w0.33: P200.37@25.795,27.635 P200.37@25.795,27.55 25.795,25.605 TPJ12.1@25.95,25.45
50R_ANT_A: CC2.2 P1.1 | length 39.7
  Top Layer w0.457: CC2.2@16.275,37 P1.1@56,37
50R_ANT_B: CC1.2 P2.1 | length 39.7
  Top Layer w0.457: P2.1@-26,37 CC1.2@13.7,37
BOARD_ID_SCL: P200.39 TPJ14.1 U200.6 | length 10.5
  Signal Layer 3 w0.1: v1(27.075,26.2) 27.075,23.341 26.85,23.116 26.85,22.316 27.25,21.916 v1@27.25,20.275
  Bottom Layer w0.1: U200.6@24.825,21.075 25.15,20.75 25.8,20.75 TPJ14.1@26.35,20.2 v1@27.375,20.2
  Bottom Layer w0.5: P200.39@27.065,27.55 27.065,26.21 v1(27.075,26.2)
  other v1: 27.275,20.225
BOARD_ID_SDA: P200.40 TPJ15.1 U200.5 | length 10.7
  Signal Layer 3 w0.1: v1@27.075,28.925 27.526,28.474 27.526,23.101 v1@27.3,22.875
  Bottom Layer w0.102: U200.5@25.225,21.425 25.225,21.65 26.3,22.725 TPJ15.1@26.325,22.725 ; TPJ15.1@26.35,22.8 v1(27.3,22.8) ; P200.40@27.05,30.6 27.075,30.575 v1(27.075,29)
BOARD_ID_WP: R200.1 TPJ16.1 U200.7 | length 14.8
  Signal Layer 3 w0.1: v1(25.75,8.625) 25.725,8.65 25.725,18.925 v1(26.075,19.275)
  Bottom Layer w0.1: U200.7@24.225,21.175 24.475,20.925 R200.1@24.475,20.55 ; TPJ16.1@24.25,8.75 25.15,8.75 25.275,8.625 v1(25.75,8.625) ; R200.1@24.7,20.375 25.025,20.375 v1@26.025,19.375
DBG_RESET: C207.1 P200.17 TPJ17.1 U1.13 | length 19.2
  Top Layer w0.1: U1.13@15.2,20.935 U1.13@15.2,21.075
  Top Layer w0.3: U1.13@15.25,21.05 15.257,21.057 v2(15.664,21.057)
  Signal Layer 3 w0.1: v2(15.664,21.057) 15.664,21.064 16.05,21.45 16.05,22.425 ; v1@16.275,25.1 15.875,24.7 15.875,23.9 16.05,23.725 16.05,22.425 ; v1(16.276,25.001) v1@16.276,25.099 ; v2(17.126,17.751) 17.126,17.926 18.779,19.579 18.779,22.046 18.4,22.425 16.05,22.425
  Bottom Layer w0.1: P200.17@13.095,26.905 13.675,26.325 14.2,26.325 15.475,25.05 16.227,25.05 v1(16.276,25.001) ; TPJ17.1@15.55,17.1 16.475,17.1 v2(17.126,17.751)
  Bottom Layer w0.3: v2@15.625,21.075 15.65,21.05 C207.1@15.65,20.65
DBG_SWCLK: P200.14 P201.23 TPJ2.1 U1.26 | length 70.9
  Top Layer w0.1: v2@6.777,19.052 7.233,19.508 9.058,19.508 9.35,19.8 U1.26@10.065,19.8
  Signal Layer 3 w0.1: v2@6.65,19.075 6.55,19.075 6.475,19.15 6.475,20.525 5.875,21.125 5.875,25.3 6.725,26.15 6.725,26.725 8.8,28.8 8.8,30.025 v2(10.55,31.775) 12.125,30.2 20.642,30.2 21.35,29.492 21.35,28.9 23.075,27.175 23.075,24.75 v2(22.65,24.325) 23.525,23.45 23.525,21.275 22.95,20.7 22.95,19.35 23.675,18.625 23.675,17.525 23.447,17.297 23.447,15.528 23.9,15.075 23.9,11.65 23.425,11.175 23.425,6.425 21.325,4.325 19.85,4.325 v1(19.175,5)
  Bottom Layer w0.1: P201.23@16.905,3.55 16.905,4.155 17.75,5 v1(19.175,5) ; TPJ2.1@18.1,24.88 18.196,24.976 18.974,24.199 18.975,24.2 22.777,24.2 22.652,24.325 v2(22.65,24.325)
  Bottom Layer w0.5: v2(10.55,31.775) 10.555,31.77 P200.14@10.555,30.45
  other v2: 6.65,18.85
DBG_SWDIOTMS: P200.13 P201.21 TPJ1.1 U1.27 | length 49.1
  Top Layer w0.1: v2(7.5,18.75) v2@7.475,18.75 ; U1.27@10.065,19.4 10.045,19.38 9.45,19.38 9.286,19.215 7.94,19.215 v2@7.475,18.75 ; v2@7.475,18.75 7.438,18.713 7.4,18.75 v2@7.475,18.75
  Signal Layer 3 w0.1: v2@7.35,18.9 7.35,19.175 6.975,19.55 6.975,21.05 6.65,21.375 6.65,24.875 7.85,26.075 7.85,27.025 9.45,28.625 9.45,29.175 9.725,29.45 10.175,29.45 10.55,29.075 v1(10.55,29) ; v2(7.5,18.75) 7.5,17.975 7.1,17.575 7.1,16.175 6.75,15.825 6.75,14.475 4.245,11.97 4.245,9.53 5.275,8.5 5.95,8.5 7.7,6.75 10.775,6.75 11.225,7.2 12.225,7.2 13.875,8.85 14.8,8.85 v1(15.35,8.3) ; v1(15.35,8.3) 15.4,8.25 15.45,8.3 v1(15.35,8.3)
  Bottom Layer w0.1: v1(10.55,29) 10.555,28.995 P200.13@10.555,27.55 ; v1(15.35,8.3) v1@15.375,8.3 ; v1@15.425,8.35 15.475,8.3 v1@15.4,8.3 ; P201.21@15.875,4.025 15.875,4.4 16.25,4.775 16.25,7.45 v1@15.4,8.3 ; TPJ1.1@17.426,8.85 17.35,8.775 16.325,8.775 16.15,8.6 15.675,8.6 v1@15.375,8.3 ; v1@15.375,8.3 v1@15.4,8.3
"DBG_SWO / DBG_TDO": P200.9 P200.15 P201.19 TPJ3.1 U1.28 | length 56.4
  Top Layer w0.1: v2(7,18.351) 7,18.274 6.926,18.2 7.525,18.2 8.248,18.923 9.399,18.923 9.475,19 U1.28@10.065,19
  Signal Layer 3 w0.1: v2@6.797,18.35 v2@6.849,18.298 ; v2@6.798,18.351 v2@6.849,18.351 ; 6.849,17.476 v2@6.849,18.298 ; 6.85,17.475 6.85,16.425 6.45,16.025 6.45,14.725 3.985,12.26 3.985,8.59 5.475,7.1 6.675,7.1 7.4,6.375 10.925,6.375 11.4,6.85 12.375,6.85 13.825,8.3 v2(14.7,8.3) ; v2(7,18.351) v2@6.951,18.351 ; v2(11.8,29) 11.8,29.025 11,29.825 9.575,29.825 9.113,29.363 9.113,28.688 7.35,26.925 v1(7.35,26.301) 7.35,26.175 6.275,25.1 6.275,21.25 6.725,20.8 6.725,19.425 7.075,19.075 7.075,18.475 v2@6.951,18.351 ; v2@6.849,18.298 v2@6.849,18.351 ; v2@6.849,18.298 6.875,18.272 6.875,18.275 v2@6.951,18.351 ; v2@6.849,18.351 6.849,18.425 v2@6.924,18.351 ; v2@6.849,18.351 v2@6.924,18.351 ; v2@6.924,18.351 6.925,18.351 v2@6.951,18.351
  Bottom Layer w0.1: v1(7.35,26.301) 7.401,26.301 7.95,26.85 P200.9@7.95,27.5 ; P200.15@11.775,27.625 11.825,27.675 11.8,27.7 v2(11.8,29) ; P201.19@14.365,3.55 14.365,4.19 15,4.825 15,7.95 v2@14.7,8.25 ; v2@14.675,8.275 v2@14.7,8.25 ; v2@14.688,8.287 v2(14.7,8.3) ; TPJ3.1@17.375,11.3 TPJ3.1@17.7,11.3 ; TPJ3.1@17.65,11.2 17.625,11.2 16.85,10.425 16.85,9.775 15.95,8.875 15.275,8.875 v2(14.7,8.3) ; v2@14.7,8.25 v2(14.7,8.3)
DBG_TDI: P200.8 P200.16 P201.17 TPJ4.1 U1.29 | length 81.6
  Top Layer w0.1: v2@5.187,18.625 5.775,18.625 6.454,17.946 7.621,17.946 8.135,18.46 9.21,18.46 9.35,18.6 U1.29@10.065,18.6
  Signal Layer 3 w0.1: v2(12.726,5) 12.15,4.425 11.175,4.425 10.39,3.64 8.685,3.64 7.755,4.57 6.73,4.57 5.8,5.5 5,5.5 2.945,7.555 2.945,15.145 5.304,17.504 5.304,17.792 5.125,17.971 5.125,18.65 5.4,18.925 5.4,19.65 4.075,20.975 4.075,24.625 4.45,25 4.45,29.5 v2(6.75,31.8) 7.129,32.179 11.421,32.179 v2(11.825,31.775) 13,30.6 21,30.6 22.45,29.15 22.45,28.4 23.375,27.475 23.375,24.175 23.875,23.675 23.875,19.9 23.6,19.625 23.575,19.65 23.526,19.601 v1(23.476,19.601)
  Bottom Layer w0.1: v2(12.726,5) 12.726,4.549 13.095,4.18 P201.17@13.095,3.55 ; TPJ4.1@18.875,19.725 19.375,20.225 22.25,20.225 22.925,19.55 23.55,19.55 23.499,19.601 v1(23.476,19.601)
  Bottom Layer w0.5: P200.8@6.745,30.45 6.745,31.795 v2(6.75,31.8) ; P200.16@11.8,30.4 11.825,30.425 v2(11.825,31.775)
  other v2: 5.15,18.626
DEBUG_TRACED1: P200.10 P201.7 U1.30 | length 37
  Top Layer w0.1: v2(5.575,18.126) 5.575,18.2 5.55,18.225 5.575,18.25 6.1,17.725 7.775,17.725 8.25,18.2 9.375,18.2 U1.30@10.065,18.2 U1.30@10.075,18.2
  Signal Layer 3 w0.1: v2@6.725,4.975 6.863,5.112 6.125,5.85 5.2,5.85 3.205,7.845 3.205,14.855 5.575,17.225 5.575,18.126 v2@5.575,18.175 ; v2(7.15,28.975) 6.775,28.975 4.8,27 4.8,24.7 4.4,24.3 4.4,21.125 5.679,19.846 5.679,18.279 v2@5.575,18.175 ; v2@5.575,18.175 5.55,18.15 5.574,18.126 5.449,18.126 5.4,18.175 5.475,18.25 5.575,18.25 v2@5.575,18.175
  Bottom Layer w0.1: P201.7@6.745,3.55 6.725,3.57 6.95,3.795 v2(6.95,5) ; v2(7.15,28.975) P200.10@7.75,29.575
DEBUG_TRACED2: P200.11 P201.11 U1.31 | length 39.1
  Top Layer w0.1: v2(6.193,17.282) 7.032,17.282 7.25,17.5 7.925,17.5 8.35,17.925 9.125,17.925 9.25,17.8 U1.31@10.065,17.8 U1.31@10.075,17.8
  Signal Layer 3 w0.1: v2@7.95,28.975 7.35,28.375 6.9,28.375 5.15,26.625 5.15,24.425 4.7,23.975 4.7,21.325 5.979,20.046 5.979,17.959 5.975,17.954 5.975,17.5 v2(6.193,17.282) 6.185,17.282 3.465,14.561 3.465,8.085 5.3,6.25 6.275,6.25 6.9,5.625 8.65,5.625 v2(9.275,5) ; v2@7.95,28.976 v2(7.95,29) ; v2@9.275,5.025 v2@9.35,5.025
  Bottom Layer w0.1: v2(7.95,29) 8.475,29 9.25,28.225 P200.11@9.25,27.8 ; v2(9.275,5) 9.275,3.56 P201.11@9.285,3.55
DEBUG_TRACED3: P200.12 P201.13 U1.32 | length 42.2
  Top Layer w0.1: v2(6.325,16.651) 6.901,16.651 7.5,17.25 8.05,17.25 8.475,17.675 9,17.675 9.225,17.45 U1.32@10.015,17.45
  Signal Layer 3 w0.1: v2@6.301,16.651 3.725,14.075 3.725,8.325 5.35,6.7 6.45,6.7 7.2,5.95 8.975,5.95 9.911,5.014 9.922,5.025 v2@9.975,5.025 ; v2(6.325,16.651) 6.597,16.923 6.597,17.628 6.225,18 6.225,20.3 4.975,21.55 4.975,23.55 5.575,24.15 5.575,26.375 7.2,28 7.6,28 8.475,28.875 8.475,30.975 v2(9.275,31.775)
  Bottom Layer w0.1: v2(9.9,5) 9.9,4.8 10.555,4.145 P201.13@10.555,3.55
  Bottom Layer w0.5: v2(9.275,31.775) 9.285,31.765 P200.12@9.285,30.45
DISP_ENABLE: P200.4 P200.27 U1.10 | length 34.5
  Top Layer w0.1: U1.10@15.935,19.4 15.985,19.35 16.525,19.35 16.75,19.125 16.75,18.75 16.945,18.555 17.52,18.555 18.186,17.889 19.514,17.889 v2@20.488,18.862
  Signal Layer 3 w0.1: v2(4.225,32.002) 4.248,32.002 4.238,32.012 5.025,32.8 15.425,32.8 16.548,31.677 v1(18.801,31.677) ; v1@19.425,26.05 19.425,25.375 19.675,25.125 19.675,22.75 19.85,22.575 19.85,19.375 v2@20.35,18.875
  Bottom Layer w0.1: P200.4@4.205,30.45 4.205,31.93 v2@4.25,31.975 ; v1(18.801,31.677) 18.724,31.6 18.8,31.524 18.8,28.825 P200.27@19.15,28.475 ; P200.27@19.175,26.675 19.25,26.75 19.4,26.6 v1(19.4,26.075)
  other v2: 20.425,19
DISP_EXTCOMIN: P200.31 P201.36 U1.7 | length 34.8
  Top Layer w0.1: U1.7@15.935,18.2 15.985,18.15 16.425,18.15 16.722,17.853 16.722,17.584 17.255,17.05 17.95,17.05 18.529,16.471 24.296,16.471 v2(24.325,16.5)
  Signal Layer 3 w0.1: v2@23.226,28.926 23.975,28.178 23.975,25.05 24.575,24.45 24.575,16.75 v2(24.325,16.5) 24.325,16.1 24.675,15.75 24.675,10.075 24.526,9.926 v2(24.526,7.875)
  Bottom Layer w0.1: P200.31@21.985,27.55 21.985,28.16 22.8,28.975 v2@23.2,28.975 ; P201.36@24.525,6.45 P201.36@24.526,6.451
  Bottom Layer w0.5: P201.36@24.526,6.451 v2(24.526,7.875)
  other v2: 23.226,29
DISP_SCLK: P200.28 P201.8 RP200.6 | length 48.5
  Signal Layer 3 w0.1: v2(7.375,2.35) 7.6,2.575 11.35,2.575 12.1,3.325 13.3,3.325 14.4,4.425 17.075,4.425 17.425,4.775 17.425,5.5 20.225,8.3 20.225,10.3 v1(20.3,10.375) 20.4,10.375 20.4,10.425 20.25,10.575 20.25,10.775 18.35,12.675 18.35,13.95 18.975,14.575 18.975,14.966 19.343,15.334 21.034,15.334 22.025,16.325 22.025,21.225 21.475,21.775 21.475,23.55 21.15,23.875 21.15,25.325 21.525,25.7 21.525,27.075 20.1,28.5 19.65,28.5 19.238,28.913 19.25,28.925 v1(19.25,28.975) 19.225,28.975 v1@19.15,29.05
  Bottom Layer w0.1: P201.8@6.745,6.45 6.745,5.855 7.375,5.225 v2(7.375,2.35) ; v1(19.25,28.975) 19.175,28.975 19.25,29.05 19.25,30.255 P200.28@19.445,30.45 ; v1@20.3,10.55 RP200.6@20.3,11.225
DISP_SCS: P200.30 P201.34 R204.1 | length 36
  Top Layer w0.1: R204.1@22.85,19.5 22.85,19.45 23.901,18.399 v2(23.901,16.951)
  Signal Layer 3 w0.1: v2(20.225,32.075) 20.225,31.475 20.625,31.075 21.225,31.075 22.822,29.478 22.822,28.728 23.675,27.875 23.675,24.6 24.25,24.025 24.25,17.3 v2(23.901,16.951) 23.901,15.699 24.274,15.326 24.277,11.352 23.8,10.875 23.8,5.55 v2(23.25,5)
  Bottom Layer w0.1: v2(20.225,32.075) 20.225,31.6 20.715,31.11 P200.30@20.715,30.45 ; v2@23.25,5.05 23.255,5.055 P201.34@23.255,6.45
DISP_SI: P200.29 P201.4 RP200.8 | length 43.8
  Signal Layer 3 w0.1: v2(4.84,2.358) 5.767,3.285 10.71,3.285 11.5,4.075 12.525,4.075 13.2,4.75 13.2,5.15 14.375,6.325 15.975,6.325 18.3,8.65 18.3,9.95 17.824,10.426 17.724,10.426 17.125,11.025 17.125,14.375 17.758,15.008 17.758,15.458 18.771,16.471 19.721,16.471 20.9,17.65 20.9,20.075 20.15,20.825 20.15,22.775 19.975,22.95 v1@19.975,25.525
  Bottom Layer w0.1: P201.4@4.205,6.45 4.205,5.835 4.84,5.2 4.85,5.2 4.85,2.368 v2(4.84,2.358) ; v2(17.851,10.426) 18.45,11.025 19.1,11.025 RP200.8@19.3,11.225 ; v1(19.875,25.625) 19.95,25.625 20.525,26.2 P200.29@20.525,26.75
EFR32_PA0: P200.22 P201.5 TPJ8.1 U1.25 | length 59.7
  Top Layer w0.1: v2(4.975,19.375) 6.375,19.375 6.8,19.8 8.975,19.8 9.375,20.2 U1.25@10.065,20.2 U1.25@10.075,20.2
  Signal Layer 3 w0.1: v2(5.475,5) 5.425,5 4.775,4.35 4.25,4.35 3.975,4.625 3.975,5.475 2.425,7.025 2.425,16.075 4.4,18.05 4.4,18.725 4.976,19.301 4.938,19.338 4.902,19.375 v2(4.975,19.375) 4.975,19.475 3.75,20.7 3.75,25.05 4.029,25.329 4.029,29.854 6.675,32.5 14.825,32.5 v2(15.525,31.8) ; v1(16.375,24.325) 17.325,24.325 v1@17.375,24.275
  Bottom Layer w0.1: P201.5@5.475,3.55 5.275,3.75 5.625,4.1 5.475,4.25 v2(5.475,5) ; P200.22@15.635,30.45 15.635,29.815 16.029,29.421 16.029,28.821 16.275,28.575 16.275,26.475 17.325,25.425 17.325,24.35 17.275,24.3 v1(17.35,24.3)
  Bottom Layer w0.5: P200.22@15.525,30.46 v2(15.525,31.8) ; TPJ8.1@15.625,24.4 15.7,24.325 v1(16.375,24.325) ; P200.22@15.625,30.46 P200.22@15.635,30.45
EFR32_PA8: P200.19 P201.12 TPJ5.1 U1.33 | length 49.1
  Top Layer w0.1: v2(8.625,17.25) 8.625,17.375 8.8,17.2 9.475,17.2 9.65,17.025 10.04,17.025 U1.33@10.065,17 U1.33@10.075,17
  Signal Layer 3 w0.1: v2(9.3,8.25) 8.825,8.25 7.325,9.75 5.55,9.75 5.025,10.275 5.025,11.15 8.121,14.246 8.121,16.6 8.358,16.836 8.358,16.983 v2(8.625,17.25) 8.625,18.975 7.75,19.85 7.75,24.125 9,25.375 9,26.875 10.108,27.983 14.283,27.983 14.925,28.625 v2(14.925,29) ; v1@16.25,25.6 16.525,25.325 18.125,25.325 18.527,24.923 v1(18.527,24)
  Bottom Layer w0.1: P201.12@9.285,6.45 9.3,6.465 v2(9.3,8.25) ; v2(14.925,29) 14.925,28.8 14.365,28.24 P200.19@14.365,27.55 14.365,26.902 15.067,26.2 15.75,26.2 16.262,25.688 v1@16.262,25.613 ; TPJ5.1@15.55,19.7 16.625,19.7 17.2,20.275 17.2,21.825 18.527,23.152 v1(18.527,24)
  other v1: 16.275,25.625
EFR32_PA9: P200.20 P201.14 TPJ6.1 U1.34 | length 57.3
  Top Layer w0.1: v2@7.8,16.825 8.925,16.825 9.1,16.65 10.015,16.65 U1.34@10.065,16.6
  Signal Layer 3 w0.1: v2(10.55,7.775) 8.65,7.775 7.075,9.35 5.425,9.35 4.765,10.01 4.765,11.415 7.85,14.5 7.85,16.65 7.75,16.75 7.775,16.775 v2(7.775,16.825) 7.775,16.971 8.3,17.496 8.3,18.95 7.5,19.75 7.5,21.949 7.425,22.024 7.425,24.4 8.625,25.6 8.625,26.95 9.942,28.267 14.017,28.267 14.3,28.55 v2(14.3,29) ; v2@14.25,28.975 15.125,29.85 20.325,29.85 20.825,29.35 20.825,28.95 22.225,27.55 22.225,24.175 23.05,23.35 v1(23.05,22.65)
  Bottom Layer w0.1: v2(14.3,29) P200.20@14.3,30.184 ; P200.20@14.301,30.184 14.2,30.285 P200.20@14.365,30.45 ; TPJ6.1@19.02,22.07 19.162,22.213 TPJ6.1@19.338,22.037 ; TPJ6.1@19.305,22.095 20.545,22.095 21.1,22.65 v1(23.05,22.65)
  Bottom Layer w0.5: v2(10.55,7.775) 10.555,7.77 P201.14@10.555,6.45
EFR32_PA10: P200.21 P201.3 TPJ7.1 U1.35 | length 49.1
  Top Layer w0.1: v2(4.85,17.675) 5.258,17.675 5.7,17.233 5.7,16.525 6.074,16.151 6.712,16.151 6.962,16.4 8.431,16.4 8.525,16.494 v2(8.525,16.4) 9.365,16.4 9.515,16.25 10.015,16.25 U1.35@10.065,16.2 U1.35@10.075,16.2
  Signal Layer 3 w0.1: v2(4.425,5) 4.425,5.575 2.685,7.315 2.685,15.51 v2(4.85,17.675) ; v2(8.525,16.4) 8.525,16.5 9.05,17.025 9.05,18.925 8,19.975 8,21.35 8.575,21.925 8.575,24.375 9.35,25.15 9.35,26.75 10.3,27.7 14.8,27.7 15.625,28.525 v2(15.625,29) ; v2(4.85,17.675) 4.85,17.775 4.8,17.725 v2(4.85,17.675)
  Bottom Layer w0.1: P201.3@4.205,3.55 4.4,3.745 4.4,4.875 v2@4.3,4.975 ; P200.21@15.425,28.225 15.625,28.425 v2(15.625,29) ; P200.21@15.635,27.55 15.635,26.911 15.95,26.596 15.95,26.517 16.875,25.592 16.875,23.975 16.1,23.2 16.1,22.42 TPJ7.1@16.49,22.03
EFR32_PB0: P200.18 P201.18 U1.24 | length 43.2
  Top Layer w0.1: v2(7.075,21.775) 7.025,21.725 7.9,20.85 8.675,20.85 8.975,20.55 10.7,20.55 U1.24@10.75,20.6
  Top Layer w0.125: v2@13.017,29 v2@13.15,28.867
  Signal Layer 3 w0.1: v2@7,21.75 7.025,21.775 v2(7.075,21.775) 7.075,24.7 8.25,25.875 8.25,27 9.8,28.55 12.684,28.55 ; v2@7.087,21.588 7.225,21.588 7.225,19.675 7.975,18.925 7.975,17.85 7.35,17.225 7.35,15.875 7.05,15.575 7.05,14.25 4.505,11.705 4.505,9.745 5.35,8.9 6.975,8.9 8.725,7.15 10.625,7.15 11.05,7.575 11.975,7.575 v1(12.525,8.125) ; 12.684,28.55 13,28.866 12.925,28.941 12.984,29 v2(13.05,29)
  Bottom Layer w0.1: v1(12.525,8.125) 12.775,7.875 12.775,7.3 13.095,6.98 P201.18@13.095,6.45 P201.18@13.095,5.87 ; v2(13.05,29) 13.05,30.025 12.925,30.15 P200.18@13.05,30.275
EFR32_PB1: P200.25 P201.20 U1.23 | length 48.5
  Top Layer w0.1: v1@10.31,21.515 10.972,21.515 11.15,21.337 U1.23@11.15,21.15
  Signal Layer 3 w0.1: v1@10.375,21.575 10.375,22.95 10.225,23.1 10.225,23.634 10.4,23.809 10.4,24.409 10.325,24.484 10.325,26.35 10.825,26.85 15.725,26.85 16.929,25.646 17.621,25.646 v2(18.1,26.125) 18.1,26.191 18.859,26.95 20.075,26.95 20.525,26.5 20.525,26.125 20.3,25.9 20.3,23.15 20.475,22.975 20.475,21.075 21.175,20.375 21.175,17.325 20.05,16.2 18.95,16.2 18.062,15.312 18.062,14.887 17.425,14.25 17.425,11.25 17.8,10.875 18.65,10.875 19.1,10.425 19.1,8.575 16.1,5.575 15.125,5.575 v2(14.55,5) ; v2(14.55,5) 14.4,5 14.475,4.925 v2(14.55,5)
  Bottom Layer w0.1: P200.25@18.075,27.475 P200.25@18.1,27.45
  Bottom Layer w0.4: v2@14.515,5 P201.20@14.515,6.225
  Bottom Layer w0.5: v2(18.1,26.125) P200.25@18.1,27.45
  other v1: 10.275,21.425
EFR32_PB2: P200.23 P201.22 U1.22 | length 49.6
  Top Layer w0.1: v1(9.9,21.9) 10.55,21.9 10.735,21.715 11.21,21.715 11.6,21.325 U1.22@11.6,20.935
  Signal Layer 3 w0.1: 9.725,23.684 9.6,23.809 ; v1@9.9,21.959 9.9,23.509 9.6,23.809 ; v2(15.65,5) 15.8,5.15 16.1,5.15 19.475,8.525 19.475,10.55 18.85,11.175 18,11.175 17.75,11.425 17.75,14.175 18.367,14.792 18.367,15.167 19.1,15.9 20.375,15.9 21.45,16.975 21.45,20.675 20.8,21.325 20.8,23.15 20.6,23.35 20.6,25.75 20.85,26 20.85,26.725 20.175,27.4 18.575,27.4 17.3,26.125 v2(17.225,26.125) 17.15,26.125 16.15,27.125 10.7,27.125 10,26.425 10,24.55 9.6,24.15 9.6,23.809
  Bottom Layer w0.1: P200.23@17.05,26.95 P200.23@17.2,27.1
  Bottom Layer w0.4: P200.23@17.05,26.95 17.05,26.3 v2(17.225,26.125)
  Bottom Layer w0.5: P201.22@15.635,6.45 15.65,6.435 v2(15.65,5)
EFR32_PB3: C6.2 P200.26 P201.24 U1.21 U3.5 | length 57.3
  Top Layer w0.25: U3.5@15.75,35.85 C6.2@16.3,35.85
  Signal Layer 3 w0.1: v1@12.025,21.725 12.025,21.625 11.4,21 10.125,21 8.925,22.2 8.925,24.1 9.7,24.875 9.7,26.6 10.525,27.425 16.825,27.425 18.363,28.962 19.25,28.075 20.025,28.075 21.2,26.9 21.2,25.9 20.875,25.575 20.875,23.6 21.15,23.325 21.15,21.55 21.725,20.975 21.725,16.625 20.725,15.625 19.25,15.625 18.671,15.046 18.671,14.696 18.05,14.075 18.05,11.675 18.275,11.45 19.075,11.45 19.85,10.675 19.85,8.425 16.9,5.475 v2(16.9,5)
  Bottom Layer w0.1: v2(16.9,5) 16.905,5.005 P201.24@16.905,6.45 ; P200.26@18.15,30.125 18.425,29.85 18.375,29.8 v2(18.375,29)
  Bottom Layer w0.2: v1(16.425,35.45) 16.55,35.45 18.025,33.975 P200.26@18.025,31.35
  other v1: 12,21.57
EFR32_PC0: P201.10 U1.1 | length 22
  Top Layer w0.1: U1.1@15.935,15.8 16.25,15.8 v2(16.703,15.347)
  Signal Layer 3 w0.1: v2@7.991,5.188 v2(7.991,5) 7.991,4.934 8.93,3.995 10.008,3.995 10.7,4.687 10.7,5.175 11.675,6.15 12.675,6.15 13.975,7.45 15.675,7.45 16.1,7.875 16.1,8.89 16.8,9.59 16.8,10 16.275,10.525 16.275,14.925 v2@16.7,15.35
  Bottom Layer w0.1: v2(7.991,5) 7.991,6.426 P201.10@8.015,6.45 P201.10@8.015,5.71
EFR32_PC1: RP200.1 U1.2 U100.D2 | length 7.5
  Top Layer w0.1: U1.2@15.935,16.2 15.985,16.15 16.475,16.15 17.3,15.325 18.075,15.325 18.876,14.524 v2(18.876,13.826) U100.D2@19.399,13.826 ; U100.D2@19.4,13.825 U100.D2@19.425,13.85
  Bottom Layer w0.1: v2(18.876,13.826) 18.776,13.826 18.35,13.4 18.35,12.825 18.85,12.325 19.25,12.325 19.3,12.275 RP200.1@19.3,12.125
EFR32_PC2: RP200.2 U1.3 U100.C3 | length 8.3
  Top Layer w0.1: U1.3@15.935,16.6 15.985,16.55 16.4,16.55 17.325,15.625 18.25,15.625 19,14.875 v1(19.45,14.875) ; U100.C3@19.625,13.5 19.625,13.375 v2@20.1,12.9
  Signal Layer 3 w0.1: v1(19.45,14.875) 19.45,13.625 20.1,12.975 v2(20.1,12.95)
  Bottom Layer w0.1: RP200.2@19.8,12.125 19.9,12.225 19.9,12.65 20.176,12.926 20.152,12.95 v2(20.1,12.95)